# Altium PCB CameraCageBB.PcbDoc (part 2 of 2)
Units mil, origin at the board's own origin, x right, y up, seen from the top; angles counter-clockwise.
Board outline 2000 x 5375 mil, 2 copper layers (Top Layer, Bottom Layer), stack 64.961 mil thick; 96 components, 83 nets, 375 pads, 83 vias.
Unrouted connection lines stored in the file: 9.
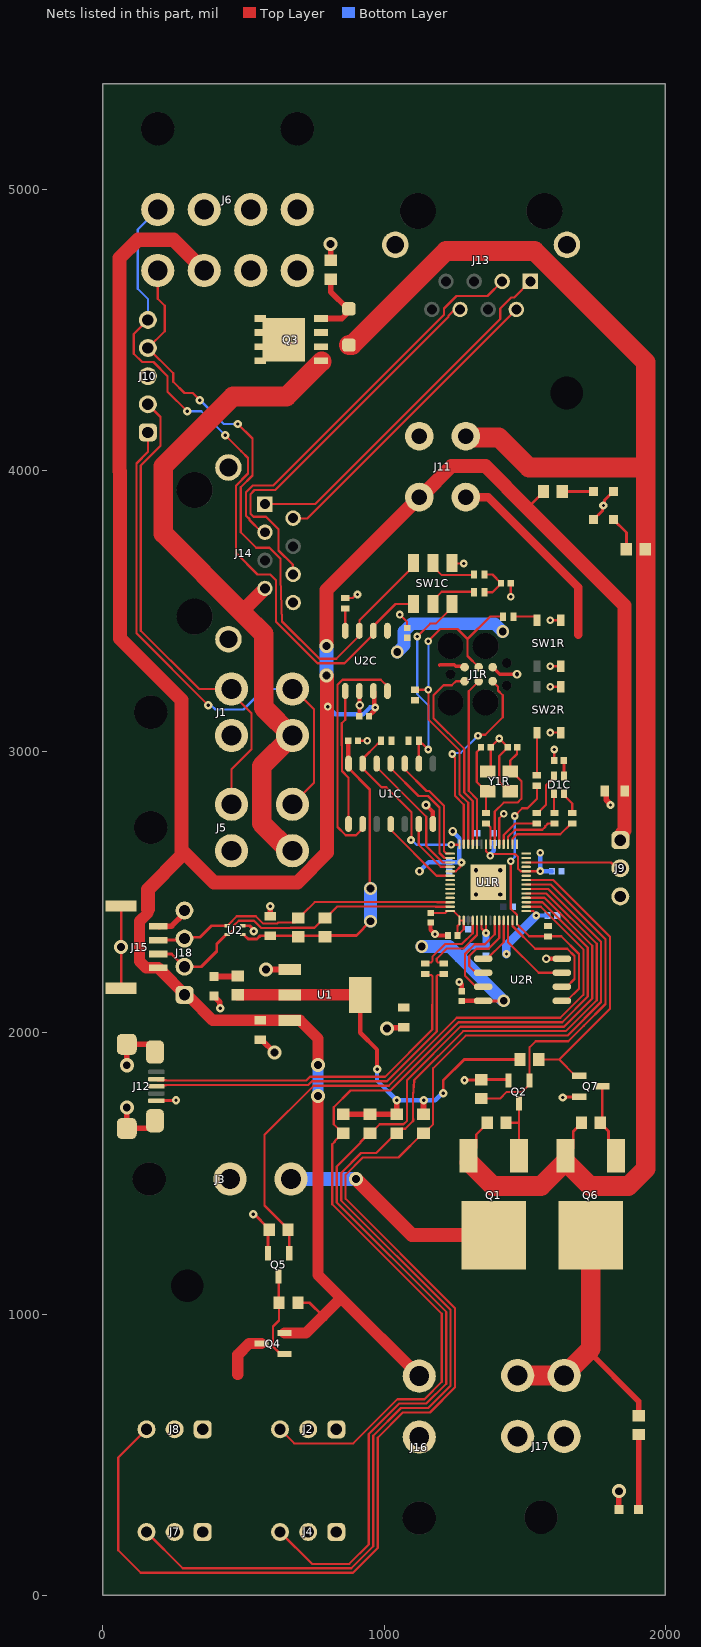
[diagram p2: the nets of this part, all layers, seen from the top]

## Via types
v1: diameter 27.56, hole 11.81, Top Layer to Bottom Layer, tented both sides, 36 vias
v2: diameter 30, hole 12, Top Layer to Bottom Layer, tented both sides, 16 vias
v3: diameter 50, hole 28, Top Layer to Bottom Layer, tented both sides, 13 vias
v4: diameter 31.5, hole 15.75, Top Layer to Bottom Layer, tented both sides, 10 vias
v5: diameter 45.28, hole 27.56, Top Layer to Bottom Layer, tented both sides, 6 vias
v6: diameter 30, hole 12, Top Layer to Bottom Layer, tented top, 2 vias

## Nets (pads, with @x,y where several pads share a name; then routed paths per layer and width w, separated by ;. In a path a pad name is that pad's centre, name@x,y a point inside that pad or via, vN(x,y) a via of type N, cw(c..) or ccw(c..) an arc to the next point about the centre after c; other vN are vias at no path point) (continued)
3V3: C1C.1 C2.1 C3.1 C3C.1 C3R.1 C4R.1 C5C.1 C5R.1 C6R.1 C7R.1 C8R.1 C9R.1 C10R.1 D1C.4 J1R.2 J11.1 R1.1 R1C.1 R4C.1 R4R.1 R5R.1 R9.1 R10.1 R11.1 R12.1 R14.1 R15.1 R18.1 U1.2 U1.4 U1C.14 U1R.1 U1R.10 U1R.22 U1R.33 U1R.42 U1R.43 U1R.44 U1R.48 U1R.49 U2.3 U2C.5 U2R.8 | length 6148
  Top Layer w7.87: C1C.1@872.56,3038.94 C1C.1@873.05,3038.44 ; C10R.1@1165.28,2426.14 1216.77,2426.14 1221.38,2430.75 1221.38,2432.64 U1R.42@1234.67,2432.64 1247.95,2432.64 U1R.43@1267.64,2412.95 ; U1R.33@1234.67,2574.37 1254.48,2574.37 1271.75,2591.64 1271.75,2602.1 v1(1275.51,2605.87) ; C4R.1@1261.14,2346.02 C4R.1@1261.14,2346.81 ; U1R.48@1346.38,2399.67 1346.38,2370.63 v1(1362.13,2354.88) U1R.49@1362.13,2399.67 ; U1R.22@1362.13,2670.33 1362.13,2645.24 v1(1377.87,2629.49) 1383.2,2629.49 1389.74,2636.03 1465.82,2636.03 1476.3,2625.55 1476.3,2599.84 1476.3,2583.6 1485.52,2574.37 1554.37,2574.37 v1(1555,2575) ; U1R.1@1505.33,2432.64 1530.37,2432.64 1540.87,2422.14 v1(1540.87,2417.23) ; C4R.1@1261.14,2346.81 1268.23,2353.9 1269.02,2353.9 1283.39,2368.27 U1R.44@1283.39,2399.67 U1R.43@1267.64,2399.67 1267.64,2386.38 1261.14,2379.88 C4R.1@1261.14,2346.81
  Top Layer w9.84: U1C.14@873.05,2957.74 873.05,2941 948.94,2865.12 948.94,2516.06 v5(951.81,2513.19) ; U2R.8@1352.34,2113.54 v5(1425.12,2113.54) ; D1C.4@1639.68,2912.95 1639.39,2913.25 1639.39,2965.66 C5C.1@1641.8,2968.07
  Top Layer w10: U2.3@497.56,2349.25 498.46,2348.35 502.4,2348.35 517.07,2333.68 548.1,2333.68 559.42,2345 C3.1@595,2345 803.62,2345 805,2346.38 901.22,2346.38 v5(951.81,2396.97) ; v2(1210,1785) 1210,1830 1285,1905 R18.1@1483,1905 ; C5C.1@1639.67,2968.07 C5C.1@1641.8,2968.07
  Top Layer w11.81: 1196.77,3306.65 1198.68,3308.56 1249.98,3308.56 1254.71,3303.83 1282.47,3303.83 J1R.2@1286.14,3300.16
  Top Layer w15: 915,2070 915,2000 975,1940 v2(975,1870.5)
  Top Layer w15.75: U1C.14@873.05,2957.74 C1C.1@873.05,3038.44 ; C3R.1@1275.51,2113.54 U2R.8@1352.34,2113.54
  Top Layer w20: R9.1@855,1710 R10.1@950,1710 R11.1@1045,1710 v2(1045,1760) ; R12.1@1140,1710 v2@1140,1759.45
  Top Layer w30: J11.1@1290.35,3905 1370,3905 1690,3585 1690,3415
  Top Layer w40: R1.1@480,2135 U1.2@665,2135 U1.4@915,2135
  Bottom Layer w15: v2(975,1870.5) 975,1830 v2(1045,1760) 1181.94,1760.02 1206.92,1785 v2(1210,1785)
  Bottom Layer w15.75: v4(1125.91,2574.37) 1158.78,2607.24 C9R.1@1232.2,2607.24 1232.89,2606.56 v1@1267.64,2606.56 ; v4(1244.02,2716.1) 1268.03,2692.09 1268.03,2656.63 1267.64,2656.23 1267.64,2613.74 v1(1275.51,2605.87) ; v1(1377.87,2629.49) 1377.87,2634.82 1389.79,2646.73 C8R.1@1389.79,2675.35 ; v1(1540.87,2417.23) 1541.04,2417.06 1581.05,2417.06 C7R.1@1581.22,2416.89 ; v1(1555,2640) v1(1555,2575) 1555.31,2574.69 1596.65,2574.69 C6R.1@1596.97,2574.37
  Bottom Layer w23.62: 1269.51,2269.15 1308.39,2308.03 C5R.1@1362.13,2308.03 v1(1362.13,2354.88)
  Bottom Layer w30: v1(1435,2280) 1435,2311.36 v1(1540.87,2417.23)
  Bottom Layer w45.28: v5(951.81,2396.97) v5(951.81,2513.19) ; v5(1047.17,3353.9) 1070.98,3377.72 1070.98,3427.36 1097.92,3454.3 1393.92,3454.3 1421.25,3426.97 v5(1421.81,3426.97) ; v5(1133.78,2306.65) 1232.01,2306.65 1269.51,2269.15 v5(1425.12,2113.54)
  other v2: 1140.57,1760.02
5V: C1.1 C4.1 C4C.1 J6.6 J9.1 J11.2 J15.1 J16.2 J18.1 Q4.2 R3.1 R8.1 U1.3 U2C.3 | length 9685.9
  Top Layer w10: R8.1@693.5,1040 735,1040 782.5,992.5 ; 1510,3865 1510,3866 1566.5,3922.5 R3.1@1566.5,3925
  Top Layer w15.75: C4C.1@946.18,3125.55 946.18,3126.34 964.66,3144.82 964.66,3153.28 v1(968.43,3157.05) 964.94,3160.53 964.94,3212.1 U2C.3@961.93,3215.12
  Top Layer w40: 160,2440 160,2426.62 130,2396.62 130,2254.61 153.43,2231.18 J15.1@196.89,2231.18 J18.1@301.54,2126.54 ; J18.1@301.89,2130 301.89,2123.11 311.89,2123.11 390.55,2044.45 U1.3@665,2044.45 700.55,2044.45 765,1980 v3(765,1885) ; Q4.2@646,932.5 722.5,932.5 782.5,992.5 846.97,1056.97 ; v3(765,1775) 765,1138.94 846.97,1056.97 ; J16.2@1125,778.94 846.97,1056.97
  Top Layer w50: 160,2440 160,2510 280,2630 280,3183.01 61.38,3401.64 61.38,3995.45 59.63,3997.2 59.63,4755 124.63,4820 251.42,4820 J6.6@360.35,4711.06 ; 280,2650 395,2535 691.62,2535 797.36,2640.74 797.36,3000.27 797.17,3000.46 797.17,3267.83 v3(795,3270) ; v3(795,3375) 795,3575 J11.2@1123.46,3903.46 ; J11.2@1133.8,3908.8 1240,4015 1360,4015 1510,3865 1855,3520 C4.1@1855,2860 1855,2719.08 1846.89,2710.97 1846.89,2691.89 J9.1@1840,2685
  Bottom Layer w15.75: v1(800,3160) 826.57,3133.43 926.35,3133.43 949.98,3157.05 v1(968.43,3157.05)
  Bottom Layer w40: v3(765,1775) v3(765,1885)
  Bottom Layer w50: v3(795,3270) v3(795,3375)
15V: D4.2 J1.3 J5.3 J11.3 J14.7 Q1.2 Q3.1 Q3.2 Q3.3 Q6.2 R2.1 R6.1 R17.1 | length 8442.8
  Top Layer w8: Q1.2@1300,1562.5 1327.5,1590 1327.5,1638.5 1366.5,1677.5 R2.1@1366.5,1680 ; R17.1@1701.5,1677.5 R17.1@1701.5,1680
  Top Layer w10: Q6.2@1645,1562.5 1672.5,1590 1672.5,1648.5 R17.1@1701.5,1677.5
  Top Layer w50: 500,3503.65 J14.7@576.35,3580
  Top Layer w70: 500,3503.65 500,3490 ; J5.3@673.94,2647.32 662.68,2647.32 565,2745 565,2948.39 J1.3@673.94,3057.32 ; J1.3@673.94,3053.94 572.01,3155.87 572.01,3417.99 500,3490 ; Q3.1@777.82,4387.18 653.11,4262.48 462.48,4262.48 215,4015 215,3775 500,3490 ; D4.2@875,4445.63 885.63,4445.63 1220,4780 1535,4780 1930,4385 1930,4010 ; J11.3@1290.35,4121.54 1294.79,4117.1 1407.9,4117.1 1515,4010 1930,4010 ; Q1.2@1303.5,1538.5 1387,1455 1558,1455 Q6.2@1641.5,1538.5 ; Q6.2@1648.5,1538.5 1732,1455 1868.63,1455 1930,1516.37 1930,4010
CANCLK_RP2CAN: U1C.6 U1R.32 | length 217.8
  Top Layer w7.87: U1C.6@1123.54,2742.68 1123.54,2668.38 1201.81,2590.12 U1R.32@1234.67,2590.12
CANH_RP2CAN: J6.5 J10.4 SW1C.4 U2C.7 | length 2290.6
  Top Layer w7.87: v2(480,4165) 531.94,4113.06 531.94,3981.94 490,3940 490,3780 545,3725 592.64,3725 631.6,3686.04 631.6,3615.91 631.6,3615.61 637.31,3462.69 770,3330 830,3330 911.93,3411.93 U2C.7@911.93,3429.68 912.51,3430.27 912.51,3467.27 1104.25,3659.02 SW1C.4@1104.25,3670.83
  Top Layer w8: J6.5@195,4711.06 195,4610 220,4585 220,4495 J10.4@160,4435 250,4345 250,4315 290,4275 320,4275 v2(345,4250)
  Bottom Layer w7.87: v2(345,4250) 430,4165 v2(480,4165)
CANL_RP2CAN: J6.1 J10.5 SW1C.1 U2C.6 | length 2509
  Top Layer w8: J10.5@160,4535 110,4485 110,4415 140,4385 180,4385 230,4335 230,4280 v2(300,4210) ; v2(435,4125) 491.61,4068.39 516.13,4043.87 516.13,3988.49 473.38,3945.74 473.38,3706.62 550,3630 595,3630 615.79,3609.21 615.79,3461.85 763.45,3314.19 859.19,3314.19 961.93,3416.93 961.93,3446.42 1040.67,3525.16 SW1C.1@1104.25,3525.16
  Bottom Layer w8: J10.5@160,4535 160,4609.82 124.07,4645.75 124.07,4856.67 J6.1@195,4927.6 ; v2(300,4210) 350,4210 v2(435,4125)
CANRX_RP2CAN: U1C.2 U2C.4 | length 845.6
  Top Layer w7.87: U1C.2@923.54,2742.68 923.54,2725.94 899.92,2702.32 863.76,2702.32 834.17,2731.91 834.17,3015.51 833.98,3015.71 833.98,3237.3 852.14,3255.47 988.31,3255.47 1011.93,3231.85 U2C.4@1011.93,3215.12
CANTX_RP2CAN: U1C.1 U2C.1 | length 487.4
  Top Layer w7.87: U2C.1@861.93,3215.12 861.93,3112.77 849.72,3100.57 849.72,3022.23 849.92,3022.04 849.92,2930.73 873.54,2907.11 U1C.1@873.54,2742.68
DBG_TX_RP2040: J1R.5 U1R.27 | length 714.8
  Top Layer w7.87: v1(1242.05,2991.69) 1242.05,2987.08 1251.89,2977.24 1251.89,2842.82 1283.39,2811.33 U1R.27@1283.39,2670.33 ; v1(1334.2,3056.65) 1337.34,3059.8 1359.37,3059.8 1421.58,3122.01 1421.58,3200.19 1404.7,3217.07 1404.7,3230.1 1386.14,3248.66 J1R.5@1386.14,3250.16
  Bottom Layer w7.87: v1(1242.05,2991.69) 1245.78,2995.42 1272.96,2995.42 v1(1334.2,3056.65)
EXT_CANH: J1.4 J5.4 J10.1 | length 1906.9
  Top Layer w8: J10.1@160,4135 160,4065 119.13,4024.13 119.13,3420.87 v2(375,3165) ; J5.4@673.94,2812.68 750.87,2889.61 750.87,3150.75 J1.4@673.94,3227.68
  Bottom Layer w8: v2(375,3165) 385.69,3165 400.69,3150 500,3150 572.68,3222.68 J1.4@673.94,3222.68
EXT_CANL: J1.2 J5.2 J10.2 | length 1729.7
  Top Layer w8: J10.2@160,4235 205,4190 205,4087.55 135,4017.55 135,3430 342.32,3222.68 J1.2@457.4,3222.68 457.4,3207.6 528.33,3136.67 528.33,3008.33 457.4,2937.4 J5.2@457.4,2812.68
FAN_PWR: J2.2 J4.2 J7.2 J8.2 Q4.3 | length 170.6
  Top Layer w40: 480,785 480,855 520,895 Q4.3@564,895
FAN_SW: Q5.1 R13.1 U1R.2 | length 2224.9
  Top Layer w7.87: Q5.1@662.5,1216 662.5,1296 R13.1@658.5,1300 658.5,1302.5 575,1386 575,1637.06 749.75,1811.81 1016.8,1811.81 1258.2,2053.22 1626.6,2053.22 1708.64,2135.25 1708.64,2296.72 1556.98,2448.39 U1R.2@1505.33,2448.39
GND: C1.2 C1C.2 C1R.2 C2.2 C2C.1 C2R.2 C3.2 C3C.2 C3R.2 C4.2 C4C.2 C4R.2 C5C.2 C5R.2 C6R.2 C7R.2 C8R.2 C9R.2 C10R.2 C11R.2 C12R.2 C13R.2 D1.2 D3.2 D5.2 D6.2 J1.1 J1R.6 J2.1 J3.1 J4.1 J5.1 J6.2 J6.3 J6.4 J7.1 J8.1 J9.3 J10.3 J11.4 J12.5 J12.6 J12.7 J12.8 J12.9 J13.S1 J13.S2 J14.8 J14.S1 J14.S2 J15.4 J15.S1 J15.S2 J16.1 J17.1 J17.2 J18.4 Q2.2 Q5.2 Q7.2 R5.2 R6C.2 R7.2 R13.2 SW1C.6 SW1R.B1 SW1R.B2 SW2R.B1 SW2R.B2 U1.1 U1C.7 U1R.19 U1R.57 U2.4 U2C.2 U2R.4 Y1R.2 Y1R.4 | length 3270.1
  Top Layer w7.87: J15.S2@65,2158.35 v3(65,2305) J15.S1@65,2451.65 ; J15.4@196.89,2378.82 J15.4@200.71,2375 ; U1.1@664.45,2225 U1.1@665,2225.55 ; R6C.2@861.93,3545.83 888.5,3545.83 901.3,3558.62 v1(905.43,3558.62) ; v1(1055.66,3487.14) 1081.35,3461.45 1081.35,3439.56 C3C.2@1081.81,3439.09 ; SW1C.6@1242.05,3670.83 1244.02,3668.86 v1(1283.39,3668.86) ; U1R.57@1409.37,2582.24 v4(1413.31,2578.31) ; U1R.19@1409.37,2670.33 1409.37,2763.35 v1(1425.12,2779.09) ; v1(1450.12,3550.75) C2C.1@1450.12,3597.99 ; v1(1590.47,3067.48) SW2R.B1@1627.87,3067.48 ; v1(1590.47,3230.87) SW2R.B2@1627.87,3230.87 ; v1(1590.47,3303.7) 1624.02,3303.7 SW1R.B1@1624.13,3303.58 ; v1(1590.47,3467.09) SW1R.B2@1627.87,3467.09
  Top Layer w8: C1C.2@904.68,3038.94 C1C.2@906.81,3038.94 v1(939.68,3038.94) ; R5.2@1343,1831.5 R5.2@1344,1832.5 ; Y1R.2@1368.74,2928.7 1379.25,2939.21 C2R.2@1379.25,3015.32 1379.25,3016.1 v1@1409.37,3046.22 ; v1(1409.37,3046.81) v1@1409.37,3046.22 ; Y1R.4@1448.74,2858.7 1442.83,2858.7 1409.31,2892.23 1409.31,2984.35 1439.49,3014.53 C1R.2@1439.49,3015.32 1439.49,3016.1 v1@1409.37,3046.22 ; SW1R.B1@1624.13,3303.58 SW1R.B1@1626.81,3306.26
  Top Layer w9.84: C5C.2@1604.84,2968.07 v1(1604.84,3007.44)
  Top Layer w10: J12.5@190.32,1759.41 259.41,1759.41 v2(260,1760) ; U2.4@497.56,2380.75 522.4,2380.75 536.55,2366.59 v2(536.55,2361.55) ; v2(535,1355) 539,1355 587.5,1306.5 R13.2@587.5,1300 ; Q5.2@587.5,1216 587.5,1296 R13.2@591.5,1300 ; v6@1287.25,1832.25 R5.2@1343.75,1832.25 ; R5.2@1345,1833.5 1440,1833.5 Q2.2@1442.5,1831 ; v6(1635,1770) 1636.25,1771.25 1692.75,1771.25 Q7.2@1694,1772.5 ; D5.2@1745,3825 1776.17,3856.17 1776.17,3871.17 v2(1780,3875) 1783.83,3878.83 1783.83,3893.83 D3.2@1815,3925
  Top Layer w11.81: J1R.6@1386.14,3300.16 1411.06,3275.24 v4(1472.68,3275.24)
  Top Layer w15.75: C4C.2@911.93,3125.55 912.62,3126.24 912.62,3164.23 v4(913.31,3164.92) 912.62,3165.61 912.62,3214.43 U2C.2@911.93,3215.12 ; v4(1149,2810.06) 1173.54,2785.52 U1C.7@1173.54,2742.68 ; C10R.2@1165.28,2391.89 1165.05,2391.66 1165.05,2366.92 v1(1181.02,2350.94) 1184.22,2350.94 1189.14,2346.02 C4R.2@1226.89,2346.02 ; v1(1267.64,2180.67) 1275.51,2172.8 C3R.2@1275.51,2147.8 ; v4(1576.59,2263.54) U2R.4@1631.87,2263.54
  Top Layer w20: v3(85,1734.61) J12.8@85,1660 159.72,1660 185.39,1685.68 J12.7@185.39,1687.56 ; v3(85,1884.61) J12.9@85,1959.21 159.72,1959.21 185.39,1933.53 J12.6@185.39,1931.65 ; J15.4@200.71,2377.01 202.91,2379.21 244.21,2379.21 290,2425 J18.4@290,2435 ; D1.2@395,2130 415.41,2109.59 415.41,2089.24 v2(417.32,2087.32) ; C1.2@560,1975 565,1975 v3(610,1930) ; v3(580,2225) 580.28,2225.28 664.17,2225.28 U1.1@664.45,2225 ; C3.2@595,2415 v2(595,2450) ; R7.2@810,4747 v3(810,4805) ; v3(1010,2015) 1012.5,2017.5 1067.5,2017.5 C2.2@1070,2020 ; R5.2@1344,1832.5 R5.2@1345,1833.5 ; C4.2@1785,2860 1790,2855 1790,2827.71 1805,2812.71 v2(1805,2810) ; D6.2@1835,305 v3(1835,370)
  other v4: 1326.69,2491.69 1413.31,2491.69 1326.69,2578.31
  other v6: 1286,1831
INT_RP2CAN: U1C.4 U1R.34 | length 297.2
  Top Layer w7.87: U1C.4@1023.54,2742.68 1023.54,2721.68 1186.6,2558.62 U1R.34@1232.2,2558.62
LEDB_RP2CAN: R8C.1 U1R.18 | length 168.1
  Top Layer w7.87: U1R.18@1425.12,2670.33 1425.12,2703.19 1466.57,2744.65 R8C.1@1543.23,2744.65
LEDG_RP2CAN: R7C.1 U1R.17 | length 213.3
  Top Layer w7.87: U1R.17@1440.87,2670.33 1440.87,2696.67 1466.21,2722.01 1562.88,2722.01 1572.74,2731.87 1572.74,2734.79 1582.6,2744.65 R7C.1@1606.22,2744.65
LEDR_RP2CAN: R5C.1 U1R.16 | length 255
  Top Layer w7.87: U1R.16@1456.61,2670.33 1456.61,2690.14 1472.73,2706.26 1626.89,2706.26 1665.28,2744.65 R5C.1@1669.21,2744.65
MISO_RP2CAN: U1C.12 U1R.31 | length 475
  Top Layer w7.87: U1C.12@973.54,2957.24 973.54,2944.77 1149.92,2768.4 1149.92,2664.28 1208.33,2605.87 U1R.31@1234.67,2605.87
MOSI_RP2CAN: U1C.11 U1R.30 | length 454.6
  Top Layer w7.87: U1C.11@1023.54,2957.24 1023.54,2940.51 1121.97,2842.09 1155.95,2842.09 1197.17,2800.87 1197.17,2639.3 1214.86,2621.61 U1R.30@1234.67,2621.61
nCS_RP2CAN: R4C.2 U1C.13 U1R.28 | length 646.2
  Top Layer w7.87: R4C.2@989.09,3038.94 989.09,3035 982.2,3028.11 977.68,3028.11 923.54,2973.98 U1C.13@923.54,2957.24 923.54,2940.51 990.73,2873.32 1008.06,2873.32 1097.17,2784.21 1097.17,2687.36 v1(1095.61,2685.81) ; v1(1238.5,2668.86) 1267.64,2668.86 U1R.28@1267.64,2670.33
  Bottom Layer w7.87: v1(1095.61,2685.81) 1097.9,2685.81 1114.85,2668.86 v1(1238.5,2668.86)
NetC2C_2: C2C.2 R2C.2 R3C.2 | length 144.3
  Top Layer w7.87: R2C.2@1357.2,3566.5 1385.16,3566.5 1415.87,3597.2 C2C.2@1415.87,3597.99 1415.87,3598.78 1385.16,3629.49 R3C.2@1357.2,3629.49
NetC2R_1: C2R.1 R1R.2 Y1R.3 | length 263.4
  Top Layer w8: C2R.1@1345,3015.32 1345,3014.53 1329.31,2998.83 1329.31,2892.23 1362.83,2858.7 Y1R.3@1368.74,2858.7 1362.13,2852.09 R1R.2@1362.13,2780.99
NetD1_1: D1.1 R1.2 | length 85.8
  Top Layer w7.87: R1.2@478,2200 R1.2@480,2202
  Top Layer w20: D1.1@395,2200 R1.2@478,2200
NetD1C_1: D1C.1 R5C.2 | length 80.1
  Top Layer w7.87: D1C.1@1639.68,2849.96 1639.68,2845.04 1669.21,2815.51 R5C.2@1669.21,2782.05
NetD1C_2: D1C.2 R7C.2 | length 68.7
  Top Layer w7.87: D1C.2@1604.25,2849.96 1604.25,2784.02 R7C.2@1606.22,2782.05
NetD1C_3: D1C.3 R8C.2 | length 158.5
  Top Layer w7.87: R8C.2@1543.23,2782.05 1547.17,2782.05 1575.71,2810.59 1575.71,2879.49 1604.25,2908.03 D1C.3@1604.25,2912.95
NetD3_1: D3.1 R3.2 | length 111.5
  Top Layer w10: R3.2@1633.5,3925 D3.1@1745,3925
NetD4_1: D4.1 Q3.4 R7.1 | length 248.1
  Top Layer w20: Q3.4@775,4540 850,4540 870,4560 870,4575 810,4635 R7.1@810,4680
NetD5_1: D5.1 R6.2 | length 124.3
  Top Layer w10: D5.1@1815,3825 1861.5,3778.5 R6.2@1861.5,3720
NetD6_1: D6.1 R16.2 | length 266.5
  Top Layer w20: D6.1@1905,305 R16.2@1905,571.5
NetJ3_2: J3.2 Q1.3 | length 803.7
  Top Layer w50: v3(900,1480) 1099.5,1280.5 Q1.3@1390,1280.5
  Bottom Layer w50: J3.2@668.94,1480 v3(900,1480)
NetJ6_7: J6.7 J6.8 Q3.D
NetQ1_1: Q1.1 Q2.3 R2.2 | length 233
  Top Layer w8: R2.2@1433.5,1680 1480,1680 ; Q1.1@1480,1562.5 1480,1680 ; Q2.3@1480,1749 1480,1680
NetQ4_1: Q4.1 Q5.3 R8.2 | length 311.2
  Top Layer w8: Q5.3@625,1134 625,1041.5 R8.2@626.5,1040 626.5,977 605,955.5 605,884.5 632,857.5 Q4.1@646,857.5
NetQ6_1: Q6.1 Q7.3 R17.2 | length 275.5
  Top Layer w10: Q7.3@1776,1810 1776,1687.5 R17.2@1768.5,1680 1768.5,1677.5 1783.5,1662.5 1786,1662.5 1798.5,1650 1798.5,1616.5 1825,1590 Q6.1@1825,1562.5
NetR2C_1: R2C.1 SW1C.2 | length 172.3
  Top Layer w7.87: SW1C.2@1173.15,3525.16 1173.15,3536.97 1204.65,3568.46 1317.83,3568.46 R2C.1@1319.8,3566.5
NetR3C_1: R3C.1 SW1C.5 | length 172.3
  Top Layer w7.87: SW1C.5@1173.15,3670.83 1173.15,3659.02 1204.65,3627.52 1317.83,3627.52 R3C.1@1319.8,3629.49
NetR6C_1: R6C.1 U2C.8 | length 78.7
  Top Layer w7.87: U2C.8@861.93,3429.68 R6C.1@861.93,3508.43
NetR6R_1: R6R.1 SW1R.A2 | length 91.3
  Top Layer w7.87: R6R.1@1459.57,3479.88 1534.37,3479.88 1543.23,3471.02 SW1R.A2@1543.23,3467.09
NetR7R_1: R7R.1 SW2R.A1 | length 151.6
  Top Layer w7.87: R7R.1@1543.23,2915.91 SW2R.A1@1543.23,3067.48
NetU1R_9: U1R.9
NetU1R_11: U1R.11
NetU1R_13: U1R.13
NetU1R_14: U1R.14
NetU1R_15: U1R.15
NetU1R_35: U1R.35
NetU1R_36: U1R.36
NetU1R_37: U1R.37
NetU1R_38: U1R.38
NetU1R_39: U1R.39
ORIN_PWR: J17.3 J17.4 Q6.3 R16.1 | length 1015.3
  Top Layer w20: 1726.91,868.09 1905,690 R16.1@1905,638.5
  Top Layer w70: J17.4@1475,790 J17.4@1475,781.54 J17.3@1640.35,781.54 1726.91,868.09 1735,876.18 Q6.3@1735,1280.5
ORIN_SW: Q7.1 R18.2 U1R.8 | length 1060.6
  Top Layer w7.87: U1R.8@1505.33,2542.87 1602.13,2542.87 1803.13,2341.87 1803.13,2085.63 1622.5,1905 ; R18.2@1550,1905 1622.5,1905 ; Q7.1@1694,1847.5 1680,1847.5 1622.5,1905
PELT_SW: Q2.1 R5.1 U1R.7 | length 1251.4
  Top Layer w7.87: R5.1@1345,1766.5 1412.53,1766.5 1436.03,1790 1490.5,1790 1517.5,1817 Q2.1@1517.5,1831 1517.5,1948.49 1539.01,1970 1655,1970 1710,2025 1710,2025.26 1787.38,2102.64 1787.38,2332.62 1592.87,2527.13 U1R.7@1505.33,2527.13
QSPI_SCLK_RP2040: U1R.52 U2R.6 | length 286.6
  Top Layer w7.87: U2R.6@1348.35,2213.54 1326.69,2213.54 1303.07,2237.17 1303.07,2273.33 1328.52,2298.78 1371.18,2298.78 1409.37,2336.97 U1R.52@1409.37,2399.67
QSPI_SD0_RP2040: U1R.53 U2R.5 | length 178.4
  Top Layer w7.87: U2R.5@1348.35,2263.54 1366.26,2263.54 1425.12,2322.4 U1R.53@1425.12,2399.67
QSPI_SD1_RP2040: U1R.55 U2R.2 | length 427.3
  Top Layer w7.87: U1R.55@1456.61,2399.67 1456.61,2379.86 1537.69,2298.78 1651.69,2298.78 1677.14,2273.33 1677.14,2203.76 1677.09,2203.7 1677.09,2191.1 1649.53,2163.54 U2R.2@1627.87,2163.54
QSPI_SD2_RP2040: U1R.54 U2R.3 | length 309.4
  Top Layer w7.87: U1R.54@1440.87,2399.67 1440.87,2322.4 1549.72,2213.54 U2R.3@1627.87,2213.54
QSPI_SD3_RP2040: U1R.51 U2R.7 | length 339.2
  Top Layer w7.87: U2R.7@1348.35,2163.54 1326.69,2163.54 1287.32,2202.91 1287.32,2279.85 1322.49,2315.02 1358.45,2315.02 1393.62,2350.19 U1R.51@1393.62,2399.67
QSPI_SS_RP2040: R5R.2 R7R.2 U1R.56 U2R.1 | length 1007.5
  Top Layer w7.87: v1(1450.71,2610.44) 1450.71,2441.13 1472.36,2419.48 U1R.56@1472.36,2399.67 ; v1(1464.49,2771.22) 1491.61,2798.35 1510.03,2798.35 1543.23,2831.55 R7R.2@1543.23,2878.5 ; U1R.56@1472.36,2386.38 1515.67,2343.07 R5R.2@1582.6,2343.07 1629.67,2343.07 1692.89,2279.85 1692.89,2156.91 1649.53,2113.54 U2R.1@1627.87,2113.54
  Bottom Layer w7.87: v1(1450.71,2610.44) 1450.71,2611.12 1464.49,2624.9 v1(1464.49,2771.22)
RGB_DATA: J9.2 U1R.12 | length 343.3
  Top Layer w7.87: U1R.12@1505.33,2605.87 1806.57,2605.87 1827.43,2585 J9.2@1840,2585
RUN_RP2040: J1R.4 R4R.2 R6R.2 U1R.26 | length 1275.3
  Top Layer w7.87: R4R.2@1110.16,3220.04 v1(1157.4,3220.04) 1157.4,3114.5 1267.64,3004.26 1267.64,2849.35 1299.13,2817.85 U1R.26@1299.13,2670.33 ; v1(1157.4,3391.94) 1157.4,3393.27 1199.73,3435.59 1261.18,3435.59 1296.58,3400.19 ; J1R.4@1336.14,3300.16 1296.58,3339.72 1296.58,3400.19 ; R6R.2@1422.17,3479.88 1376.27,3479.88 1296.58,3400.19
  Bottom Layer w7.87: v1(1157.4,3220.04) v1(1157.4,3391.94)
RX_N: J13.6 J14.6 | length 1393
  Top Layer w8: J14.6@676.35,3630 675.13,3631.23 675.13,3664.87 624.61,3715.39 624.61,3790.39 580,3835 535.69,3835 525,3845.69 525,3915.41 539.53,3929.93 612.56,3929.93 1228.93,4546.31 1228.93,4549.63 1251.43,4572.13 J13.6@1270,4572.13
RX_P: J13.3 J14.3 | length 1411.7
  Top Layer w8: J14.3@576.35,3780 565,3780 521.31,3823.69 521.31,3826.75 509,3839.06 509,3922.03 532.9,3945.93 605.93,3945.93 1212.93,4552.93 1212.93,4575.78 1257.27,4620.11 1367.99,4620.11 J13.3@1420,4672.13
SCK_RP2CAN: U1C.10 U1R.29 | length 400.1
  Top Layer w7.87: U1C.10@1073.54,2957.24 1073.54,2937 1150.92,2859.63 1160.68,2859.63 1212.91,2807.39 1212.91,2645.83 1221.38,2637.36 U1R.29@1234.67,2637.36
SCL: J15.2 J18.2 R14.2 U1R.41 U2.2 | length 1193.1
  Top Layer w7.87: U2.2@446.38,2349.25 465.59,2368.46 465.59,2381.23 482.82,2398.46 537.56,2398.46 563.58,2372.44 666.74,2372.44 667.61,2373.31 752.31,2373.31 782.87,2403.87 793.87,2403.87 793.87,2409.87 832.98,2448.98 1181.98,2448.98 1182.57,2448.39 U1R.41@1234.67,2448.39
  Top Layer w10: J15.2@196.89,2280.39 244.61,2280.39 J18.2@290,2235 350,2235 405,2290 405,2315.75 438.5,2349.25 U2.2@442.44,2349.25 U2.2@446.38,2349.25
SDA: J15.3 J18.3 R15.2 U1R.40 U2.1 | length 1116.1
  Top Layer w7.87: U2.1@446.38,2380.75 448.35,2382.72 448.35,2386.26 476.3,2414.21 544.08,2414.21 570.11,2388.19 619.89,2388.19 624.14,2392.44 681.44,2392.44 713.56,2424.56 713.56,2424.64 753.65,2464.72 1188.5,2464.72 1189.09,2464.13 U1R.40@1234.67,2464.13
  Top Layer w10: J15.3@196.89,2329.61 284.61,2329.61 J18.3@290,2335 ; J18.3@292.7,2332.3 300.39,2340 345,2340 385.75,2380.75 U2.1@442.44,2380.75 U2.1@446.38,2380.75
SWCLK_RP2040: J1R.3 U1R.24 | length 606.9
  Top Layer w7.87: U1R.24@1330.63,2670.33 1330.63,2830.9 1300.7,2860.82 1300.7,3214.72 J1R.3@1336.14,3250.16
SWDIO_RP2040: J1R.1 U1R.25 | length 718.6
  Top Layer w7.87: J1R.1@1286.14,3250.16 1255.6,3250.16 1241.04,3235.59 1211.11,3235.59 1175.7,3200.19 1175.7,3118.94 1284.96,3009.69 1284.96,2854.3 1314.88,2824.37 U1R.25@1314.88,2670.33
TACH1: J8.3 R12.2 U1R.6 | length 4960.1
  Top Layer w7.87: J8.3@155,590 55,490 55,160 135,80 889.54,80 977.24,167.7 977.24,560.43 1066.81,650 1163.1,650 1252.24,739.15 1252.24,1020.7 863.19,1409.75 863.19,1495.25 924.58,1556.64 1051.14,1556.64 1137.5,1643 R12.2@1140,1643 1142.5,1643 1174.31,1674.81 1174.31,1874.31 1290,1990 1652.47,1990 1771.63,2109.16 1771.63,2323.37 1583.62,2511.38 U1R.6@1505.33,2511.38
TACH2: J7.3 R11.2 U1R.5 | length 4321.2
  Top Layer w7.87: J7.3@155,225 284.25,95.75 883.02,95.75 961.5,174.23 961.5,566.95 1060.29,665.75 1156.57,665.75 1236.5,745.67 1236.5,1014.17 847.44,1403.23 847.44,1501.77 918.06,1572.39 971.89,1572.39 1042.5,1643 R11.2@1045,1643 1061.06,1659.06 1075.54,1659.06 1101.86,1685.39 1103.38,1686.91 1103.38,1693.43 1103.19,1694.75 1103.19,1774.7 1107.04,1832.04 1280.97,2005.97 1646.17,2005.97 1755.88,2115.69 1755.88,2316.29 1576.55,2495.63 U1R.5@1505.33,2495.63
TACH3: J4.3 R10.2 U1R.4 | length 3801.8
  Top Layer w7.87: J4.3@630,225 743.5,111.5 876.5,111.5 945.75,180.75 945.75,573.48 1053.77,681.5 1150.05,681.5 1220.75,752.19 1220.75,1007.65 831.69,1396.71 831.69,1524.69 916,1609 916,1611.5 947.5,1643 R10.2@950,1643 952.5,1643 984.31,1674.81 1069.01,1674.81 1081.81,1687.61 1081.81,1832.28 1271.25,2021.72 1639.65,2021.72 1740.14,2122.21 1740.14,2309.77 1570.02,2479.88 U1R.4@1505.33,2479.88
TACH4: J2.3 R9.2 U1R.3 | length 3379
  Top Layer w7.87: J2.3@630,590 680,540 890,540 1047.24,697.24 1143.53,697.24 1205,758.72 1205,1001.13 815.95,1390.18 815.95,1603.95 825.4,1613.4 825.4,1615.9 852.5,1643 820.69,1674.81 820.69,1734.89 880.8,1795 1022.26,1795 1264.73,2037.47 1633.12,2037.47 1724.39,2128.73 1724.39,2303.25 1563.5,2464.13 U1R.3@1505.33,2464.13
TERM_DET_RP2CAN: R1C.2 SW1C.3 U1C.9 | length 723.9
  Top Layer w7.87: v1(1118.03,3409.02) 1164.1,3455.09 1183.79,3455.09 1242.05,3513.35 SW1C.3@1242.05,3525.16 ; U1C.9@1123.54,2957.24 R1C.2@1123.54,3035 ; R1C.2@1123.54,3038.94 R1C.2@1123.54,3035 ; v1(1157.4,3007.44) 1136.73,3028.11 1130.43,3028.11 R1C.2@1123.54,3035
  Bottom Layer w7.87: v1(1118.03,3409.02) 1118.03,3204.29 1157.4,3164.92 v1(1157.4,3007.44)
TX_N: J13.2 J14.2 | length 1102.3
  Top Layer w8: J14.2@676.35,3830 677.84,3828.52 726.39,3828.52 J13.2@1470,4572.13
TX_P: J13.1 J14.1 | length 1293.9
  Top Layer w8: J14.1@576.35,3880 755,3880 1412.93,4537.93 1412.93,4575.78 1452.22,4615.06 1462.93,4615.06 J13.1@1520,4672.13
USB_N: J12.2 R3R.1 | length 1276.2
  Top Layer w7.87: R3R.1@1146.51,2209.21 1150.23,2205.49 1167.03,2205.49 1171.64,2200.88 1171.64,2100.58 1171.45,2100.39 1171.45,2011.7 1171.39,2011.64
  Top Layer w8: J12.2@190.32,1835.2 194.19,1831.32 223.54,1831.32 224.47,1830.4 723.36,1830.4 736.58,1843.62 1003.62,1843.62 1171.39,2011.39 1171.39,2011.64
USB_P: J12.3 R2R.1 | length 1302.6
  Top Layer w7.87: 1187.39,2093.79 1187.39,2093.88 1187.51,2094.01 1187.51,2201.01 1192,2205.49 1208.8,2205.49 R2R.1@1212.52,2209.21
  Top Layer w8: J12.3@190.32,1809.61 194.19,1813.48 223.54,1813.48 224.47,1814.4 729.98,1814.4 743.2,1827.62 1010.25,1827.62 1187.39,2004.76 1187.39,2093.79
USB_RP2040_N: R3R.2 U1R.46 | length 267.4
  Top Layer w7.87: R3R.2@1146.51,2246.61 1150.23,2250.34 1167.03,2250.34 1171.64,2254.95 1171.64,2270.3 1217.28,2315.94 1276.56,2315.94 1314.88,2354.26 U1R.46@1314.88,2399.67
USB_RP2040_P: R2R.2 U1R.47 | length 267.4
  Top Layer w7.87: R2R.2@1212.52,2246.61 1208.8,2250.34 1192,2250.34 1187.39,2254.95 1187.39,2263.78 1223.8,2300.19 1283.08,2300.19 1330.63,2347.74 U1R.47@1330.63,2399.67
XIN_RP2040: C1R.1 U1R.20 Y1R.1 | length 443.1
  Top Layer w7.87: U1R.20@1393.62,2670.33 1393.62,2786.97 1425.12,2818.46 1474.42,2818.46 1488.11,2832.16 1488.11,2895.24 1454.65,2928.7 Y1R.1@1448.74,2928.7 1448.74,2967.97 1472.46,2991.69 1472.46,3014.04 C1R.1@1473.74,3015.32
XOUT_RP2040: R1R.1 U1R.21 | length 82.1
  Top Layer w7.87: R1R.1@1362.13,2743.58 1366.06,2743.58 1377.87,2731.77 U1R.21@1377.87,2670.33
pads on no net: J1. J1R.A J1R.B J1R.C J1R.D J1R.E J1R.F J1R.G J3. J5. J6. J12.1 J12.4 J13.4 J13.5 J13.7 J13.8 J13.MH1 J13.MH2 J14.4 J14.5 J14.MH1 J14.MH2 J16. J17. SW1R.A1 SW2R.A2 U1C.3 U1C.5 U1C.8

## Polygon pours and split planes (outlines as drawn)
3V3 on Top Layer "3V3_RP2040" (solid, pour order 1): 854.02,2054.68 854.02,3483.43 1774.02,3483.43 1774.02,2054.68
FAN_PWR on Top Layer "FAN_PWR_L01_P004" (solid, pour order 4): 64.76,123.38 920,123.38 920,808.38 64.76,808.38
15V on Top Layer "15V_L01_P007" (solid, pour order 7): 745,4505 745,4375 815,4375 850,4410 900,4410 900,4505
NetJ6_7 on Top Layer "NETJ6_7_L01_P006" (solid, pour order 6): 455,4785 765,4785 765,4650 720,4605 720,4375 540,4375 535,4380 535,4575 455,4655
GND on Bottom Layer "GND_L01_P000" (solid, pour order 0): 8.25,-18.51 2008.25,-18.51 2008.25,5356.49 8.25,5356.49

## Keep-outs
Keep-Out Layer:
  region: 110,1100 ccw(c300,1100) 300,910 ccw(c300,1100) 490,1100 ccw(c300,1100) 300,1290 ccw(c300,1100)
  region: 1460,4275 ccw(c1650,4275) 1650,4085 ccw(c1650,4275) 1840,4275 ccw(c1650,4275) 1650,4465 ccw(c1650,4275)

## Other copper
Top Layer:
  pour cut-out: 1372.58,2606.97 1422.58,2656.97 1467.58,2656.97 1467.58,2566.97 1432.58,2566.97
  pour cut-out: 1479.67,2516.75 1479.45,2516.97 1262.7,2516.97 1262.7,2464.36 1290.02,2437.04 1362.64,2437.04 1377.7,2421.97 1477.7,2421.97
  pour cut-out: 856.81,2946.97 856.81,2736.97 861.81,2731.97 1111.81,2731.97 1111.81,2871.97 1051.81,2961.97
  pour cut-out: 1492.5,2814.78 1492.53,2814.82 1512.93,2814.82 1511.81,3015.39 1500.29,3026.91 1495.64,3026.91 1495.64,2991.34 1471.59,2967.28 1471.59,2945.11 1486.6,2930.09 1486.6,2920.09
  pour cut-out: 1233.96,3317.54 1244.71,3313.49 1277.6,3313.49 1283.65,3319.54 1283.65,3349.54 1258.65,3349.54 1248.65,3339.54

## Silkscreen, mask and mechanical layers (free items; w line width, h text height)
Top Overlay:
  drawing of 19 lines, arcs and shapes, not listed
  text "CAM CAGE INTERCONN" at 810,5359.92 h60 r270
  text "DVL | SWITCH" at 1710,5335 h72 r270
  text "ORIN CAN" at 335,4630 h72 r270
  text "EXTRA / POWER" at 1032.05,4235 h72
  text "DVL SUBCONN" at 745,4120 h72 r270
  text "5V / PWR" at 1744.03,3965 h60
  text "15V / PWR" at 1625,3605 h60
  text "TERM / ON" at 1061.81,3519.68 h40 r90
  text "RESET" at 1706.33,3292.09 h40 r90
  text "EXT. CAN" at 755,3080.9 h60 r270
  text "BOOT" at 1706.33,3075.86 h40 r90
  text "DEPTH" at 15,2479.01 h40
  text "LED STRIP" at 1925,2052.06 h60 r90
  text "3V3 / PWR" at 325,1900 h60
  text "PELTIER" at 21.08,1250 h72
  text "ORIN" at 1347.06,866.06 h72
  text "SWITCH" at 912.06,865 h72
  text "FAN 1" at 55,730 h60
  text "FAN 4" at 530,730 h60
  text "ORIN / PWR" at 1755.03,60 h60
  text "FAN 2" at 55,30.04 h60
  text "FAN 3" at 530,30.04 h60
Bottom Overlay:
  text "CANL" at 109.65,5060.65 h40 r180
  text "GND" at 440.36,5060.65 h40 r180
  text "GND" at 274.98,5059.58 h40 r180
  text "GND" at 605.69,5059.58 h40 r180
  text "CANH" at 121.75,4631.07 h40 r180
  text "5V" at 287.11,4631.07 h40 r180
  text "15V" at 452.46,4631.07 h40 r180
  text "15V" at 617.81,4631.07 h40 r180
  text "v'.BoardRevision'" at 1760,4340.06 h60 r270
  text "GND" at 1045,4101.6 h40
  text "15V" at 1482.32,4101.6 h40
  text "5V" at 1050,3876.6 h40
  text "3V3" at 1483.99,3876.6 h40
  text "CANH" at 649.01,3305.69 h40 r270
  text "CANL" at 339.01,3195.69 h40 r270
  text "15V" at 753.93,2984.08 h40 r270
  text "GND" at 324.35,2971.98 h40 r270
  text "'.ProjectTitle'" at 1759.99,2890 h60 r270
  text "The Underwater Robotics Team" at 1865,2890 h60 r270
  text "CANH" at 753.93,2739.43 h40 r270
  text "CANL" at 325.42,2727.3 h40 r270
  text "15V" at 753.93,2574.08 h40 r270
  text "GND" at 324.35,2561.98 h40 r270
  text "GND" at 521.67,2409.01 h40
  text "SDA" at 521.67,2309.01 h40
  text "SCL" at 481.68,2209.01 h40
  text "5V" at 535,2099.01 h40
  text "15V SW" at 649.01,1560 h40 r270
  text "GND" at 424.01,1555 h40 r270
  text "GND" at 390.99,835 h40 r90
  text "GND" at 865.99,835 h40 r90
  text "TACH" at 180.99,821.67 h40 r90
  text "TACH" at 655.99,821.67 h40 r90
  text "5V" at 280.99,781.68 h40 r90
  text "5V" at 755.99,781.68 h40 r90
  text "5V" at 1045,759.01 h40
  text "15V SW" at 1395,730.41 h40
  text "15V SW" at 1845,730.41 h40
  text "GND" at 1838.99,545.07 h40
  text "GND" at 1400,536.6 h40
  text "GND" at 1050,534.01 h40
  text "GND" at 390.99,470 h40 r90
  text "GND" at 865.99,470 h40 r90
  text "TACH" at 180.99,456.67 h40 r90
  text "TACH" at 655.99,456.67 h40 r90
  text "5V" at 280.99,416.68 h40 r90
  text "5V" at 755.99,416.68 h40 r90
Mechanical 1:
  circle w0.5: c225,365 r58
  lines w0.5: 0,3000 0,0 2000,0 2000,3000 ; 2000,3000 ccw(c2000,3000) 2000,3000

## Text inside footprints (layer, text, board x,y; h text height)
J18: Top Overlay "1" at 270,2065 h30 r90